# Altium PCB PCB1.PcbDoc
Units mm, origin at the board's own origin, x right, y up, seen from the top; angles counter-clockwise.
Board outline 133 x 70 mm, 2 copper layers (Top Layer, Bottom Layer); 56 components, 56 nets, 401 pads, 407 vias.
Unrouted connection lines stored in the file: 29.
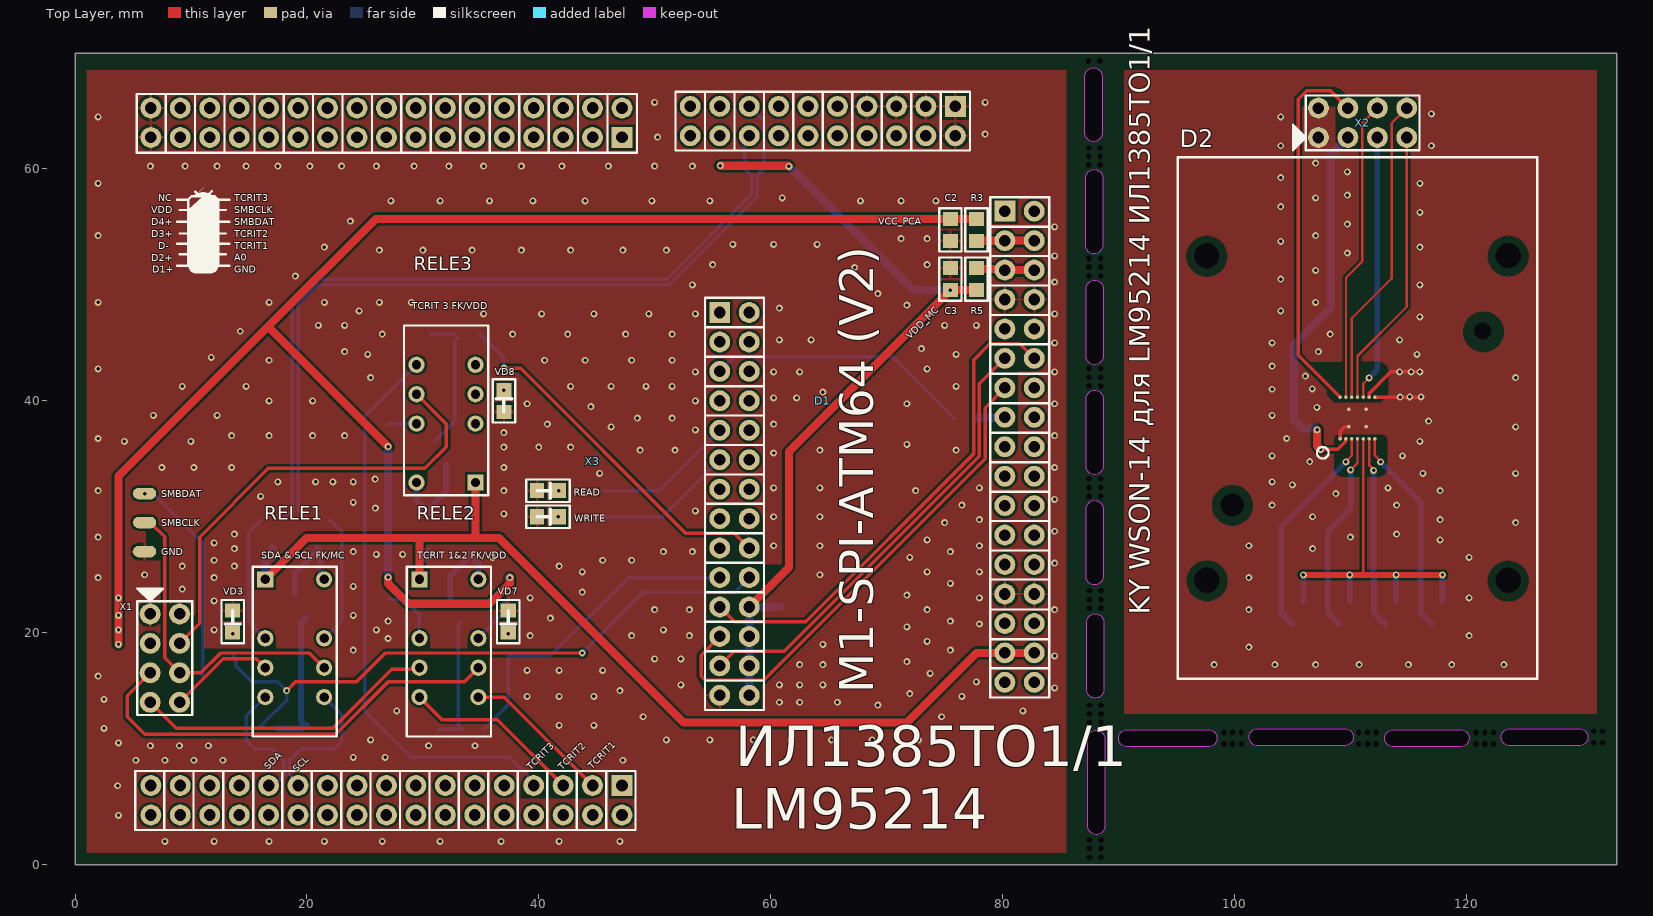
[diagram p0: Top Layer view]
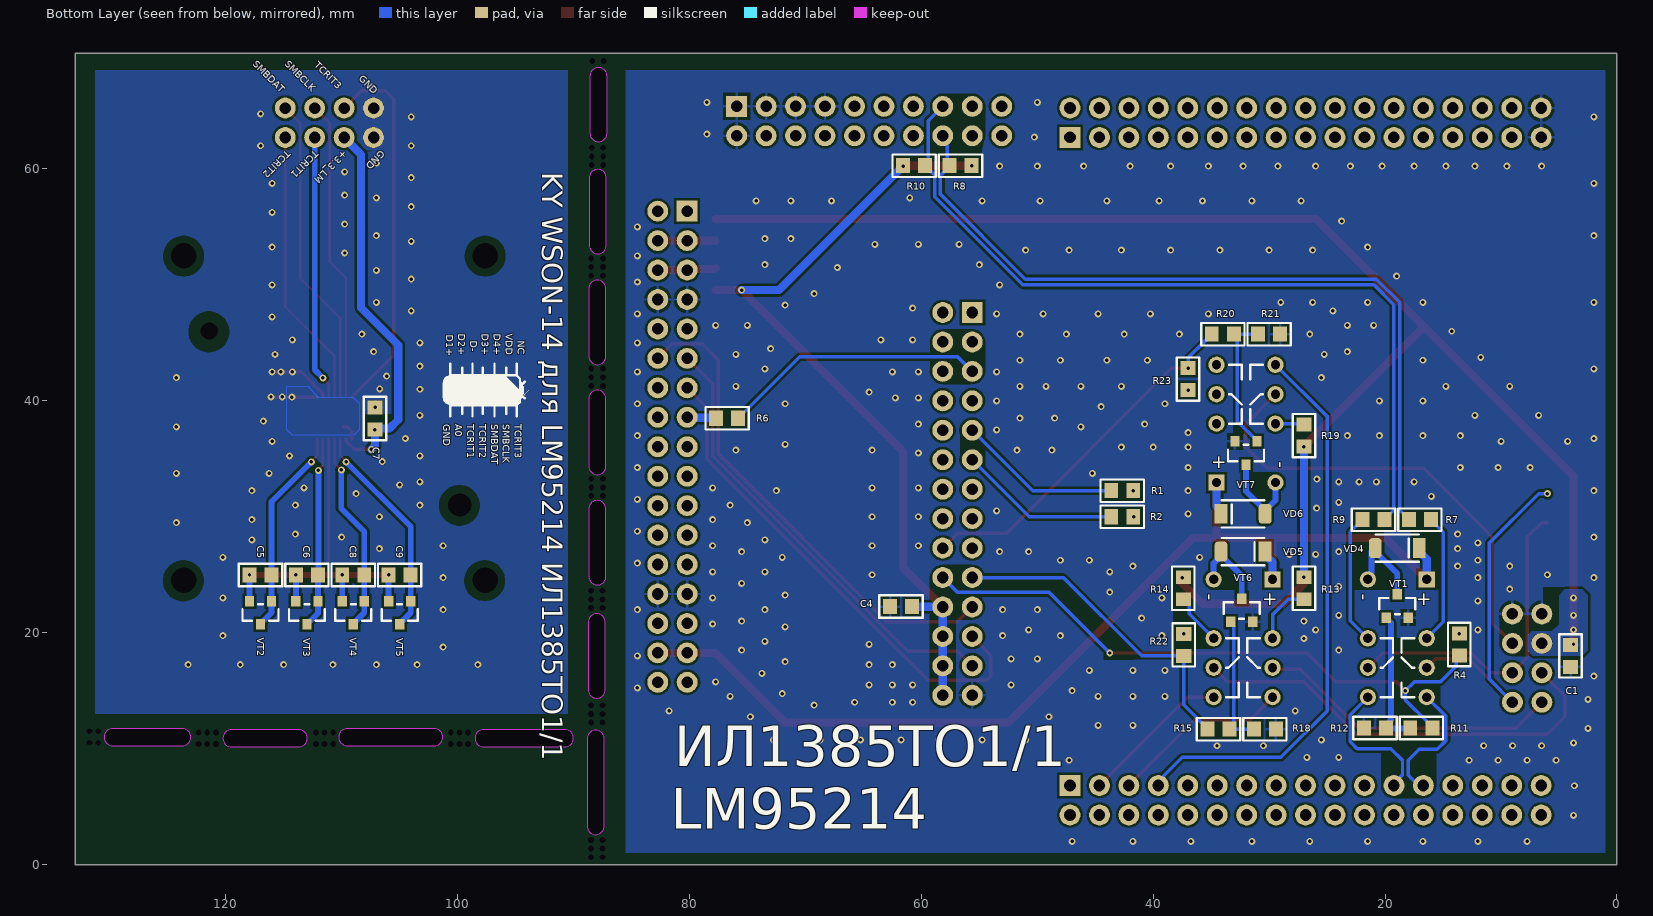
[diagram p1: Bottom Layer view, seen from below]

## Layer stack, top to bottom
Top Solder: solder mask 0.0102, Solder Resist, Dk 3.5
Top Layer: signal copper 0.0356
Dielectric 1: dielectric 0.32, FR-4, Dk 4.8
Bottom Layer: signal copper 0.0356
Bottom Solder: solder mask 0.0102, Solder Resist, Dk 3.5

## Board outline
0,0 133,0 133,70 0,70
cut-out: 109.515,11.73 cw(c109.515,10.989) 109.515,10.247 102.006,10.247 cw(c102.006,10.989) 102.006,11.73
cut-out: 97.758,11.637 cw(c97.758,10.895) 97.758,10.154 90.75,10.154 cw(c90.75,10.895) 90.75,11.637
cut-out: 129.75,11.73 cw(c129.75,10.989) 129.75,10.247 123.756,10.247 cw(c123.756,10.989) 123.756,11.73
cut-out: 119.508,11.637 cw(c119.508,10.895) 119.508,10.154 113.712,10.154 cw(c113.712,10.895) 113.712,11.637
cut-out: 88.742,15.087 cw(c88,15.087) 87.258,15.087 87.258,20.883 cw(c88,20.883) 88.742,20.883
cut-out: 88.589,63.087 cw(c87.848,63.087) 87.106,63.087 87.106,68 cw(c87.848,68) 88.589,68
cut-out: 88.647,53.423 cw(c87.905,53.423) 87.164,53.423 87.164,59.219 cw(c87.905,59.219) 88.647,59.219
cut-out: 88.685,43.87 cw(c87.943,43.87) 87.201,43.87 87.201,49.666 cw(c87.943,49.666) 88.685,49.666
cut-out: 88.685,34.37 cw(c87.943,34.37) 87.201,34.37 87.201,40.166 cw(c87.943,40.166) 88.685,40.166
cut-out: 88.835,3.33 cw(c88.093,3.33) 87.352,3.33 87.352,10.839 cw(c88.093,10.839) 88.835,10.839
cut-out: 88.685,24.87 cw(c87.943,24.87) 87.201,24.87 87.201,30.666 cw(c87.943,30.666) 88.685,30.666

## Design rules (kind name [scope] priority, off if disabled: settings)
Clearance [All] p1: gap=0.2 ignorepadtopadclearanceinfootprint=FALSE except(0: Arc-Hole Track-Hole SMDPad-Hole THPad-Hole Via-Hole Fill-Hole Poly-Hole Region-Hole Text-Hole)
ComponentClearance [All] p1: gap=0 collisioncheckmode=3 verticalgap=0 showdistances=FALSE
HoleToHoleClearance [All] p1: gap=0.1 allowstackedmicrovias=TRUE
PolygonConnect [InNet('GND')] p1: thpad.connectstyle=Relief thpad.reliefconductorwidth=0.254 thpad.reliefentries=4 thpad.polygonreliefangle="90 Angle" thpad.airgapwidth=0.254 smdpad.connectstyle=Relief smdpad.reliefconductorwidth=0.254 smdpad.reliefentries=4 smdpad.polygonreliefangle="90 Angle" smdpad.airgapwidth=0.254 via.connectstyle=Direct via.reliefconductorwidth=0.254 via.reliefentries=4 via.polygonreliefangle="90 Angle" via.airgapwidth=0.254
RoutingVias [All] p1: holewidth=0.3 width=0.6 viastyle="Through Hole" minholewidth=0.3 minwidth=0.6 maxholewidth=0.6 maxwidth=1.2
SilkToSilkClearance [All] p1: silktosilkclearance=0
SilkToSolderMaskClearance [IsPad] p1: minsilkscreentomaskgap=0 clearancetoexposedcopper=TRUE
SolderMaskExpansion [All] p1: expansion=0.102 istentingtop=FALSE
Width [All] p1: maxlimit=1.2 minlimit=0.2 preferedwidth=0.3
26 further rules are at their usual default settings.

## Components (designator, comment, footprint, x,y, rotation, side; value= is the part's Value field where it differs from the comment)
C1 "0.1uF" 0805 4,18 r270 bottom
C2 "10uF" 0805 75.5,54.75 r270 top
C3 "10uF" 0805 75.5,50.5 r90 top
C4 "0.1uF" 0805 61.75,22.25 r0 bottom
C5 "100pF" 0805 117,24.98 r180 bottom
C6 "100pF" 0805 113,24.98 r180 bottom
C7 "100pF" 0805 107.12,38.48 r90 bottom
C8 "100pF" 0805 109,24.98 r180 bottom
C9 "100pF" 0805 105,24.98 r180 bottom
D1 "M1-SPI-ATM64(V2)" M1-SPI-ATM64(V2) 64.5,40 r270 top locked
D2 "LM95214" LM95214 110.617,38.521 r180 top locked
GND "Contact" Contact 6,27 r180 top (schematic designator KP3)
R1 "2.2k" 0805 42.67,32.25 r180 bottom
R2 "2.2k" 0805 42.67,30 r180 bottom
R3 "1" 0805 77.75,54.75 r90 top
R4 "2.2k" 0805 13.6,18.98 r90 bottom
R5 "1" 0805 77.75,50.5 r270 top
R6 "1" 0805 76.75,38.5 r0 bottom
R7 "100" 0805 17,29.75 r0 bottom
R8 "4.7k" 0805 56.62,60.28 r180 bottom
R9 "100" 0805 21,29.75 r180 bottom
R10 "4.7k" 0805 60.62,60.28 r0 bottom
R11 "1k" 0805 16.88,11.78 r0 bottom
R12 "20k" 0805 20.88,11.78 r0 bottom
R13 "10k" 0805 27,23.832 r90 bottom
R14 "10k" 0805 37.405,23.832 r90 bottom
R15 "1k" 0805 34.37,11.68 r180 bottom
R18 "20k" 0805 30.37,11.68 r180 bottom
R19 "10k" 0805 27,37 r270 bottom
R20 "1k" 0805 34,45.75 r180 bottom
R21 "20k" 0805 30,45.75 r180 bottom
R22 "2.2k" 0805 37.37,18.955 r90 bottom
R23 "2.2k" 0805 37,41.87 r270 bottom
READ "LED(0805)" 0805(LED) 40.8,32.25 r180 top (schematic designator VD1)
RELE1 "V23079A1001B301 TE" V23079A1001B301 18.95,18.3 r270 top locked (schematic designator K1)
RELE2 "V23079A1001B301 TE" V23079A1001B301 32.25,18.3 r270 top locked (schematic designator K2)
RELE3 "V23079A1001B301 TE" V23079A1001B301 32,39.25 r90 top locked (schematic designator K3)
SMBCLK "Contact" Contact 6,29.5 r180 top (schematic designator KP2)
SMBDAT "Contact" Contact 6,32 r180 top (schematic designator KP1)
VD3 "LED(0805)" 0805(LED) 13.6,20.95 r90 top
VD4 "LL4148 NXP" SOD80C 18.95,27.3 r180 bottom
VD5 "LL4148 NXP" SOD80C 32.25,27 r180 bottom
VD6 "LL4148 NXP" SOD80C 32.25,30.25 r0 bottom
VD7 "LED(0805)" 0805(LED) 37.37,20.95 r90 top
VD8 "LED(0805)" 0805(LED) 37,40 r270 top
VT1 "MMBT5551L" SOT-23 18.95,22.3 r180 bottom
VT2 "MMBT3904" SOT-23 117,21.73 r0 bottom
VT3 "MMBT3904" SOT-23 113,21.73 r0 bottom
VT4 "MMBT3904" SOT-23 109,21.73 r0 bottom
VT5 "MMBT3904" SOT-23 105,21.73 r0 bottom
VT6 "MMBT5551L" SOT-23 32.37,21.93 r180 bottom
VT7 "MMBT5551L" SOT-23 32,35.5 r0 bottom
WRITE "LED(0805)" 0805(LED) 40.8,30 r180 top (schematic designator VD2)
X1 "PBD-8" PBD-8 7.75,14 r0 top locked
X2 "PBD-8" PBD-8 114.87,63.98 r90 top
X3 "FORMULA" FORMULA 35,33.5 r0 top locked

## Footprints (in the part's own frame and the unit in brackets; to place one, negate y for a bottom-side part, rotate by r counter-clockwise, add the part's x,y. Pads: shape width x height; smd on the part's side, far side on the other; paste and mask are expansions set on the pad)
0805 [mm]
  rect 1.2x1.3 smd: 1(-0.95,0) 2(0.95,0)
  silkscreen extent -1.87,-0.97 1.87,0.97, body extent -1.05,-0.63 0.95,0.63, height 0.55
0805(LED) [mm]
  rect 1.2x1.3 smd: 1(-0.95,0) 2(0.95,0)
  silkscreen extent -1.87,-0.97 1.87,0.97, body extent -1.03,-0.41 1.03,0.5, height 0.85
Contact [mm]
  oval 2x1 smd: 1(0,0)
FORMULA [mm]
  rect 1.8x1.8 hole 1: 1(12.18,29.22) VDDF(12.18,-26.68) VEEF(45.2,22.86)
  round 1.8 hole 1: 2(9.64,29.22) 3(7.1,29.22) 4(4.56,29.22) 5(2.02,29.22) 6(-0.52,29.22) 7(-3.06,29.22) 8(-5.6,29.22) 9(-8.14,29.22) 10(-10.68,29.22) 11(-13.22,29.22) 12(-15.76,29.22) 13(-18.3,29.22) 14(-20.84,29.22) 15(-23.38,29.22) 16(-25.92,29.22) 17(12.18,31.76) 18(9.64,31.76) 19(7.1,31.76) 20(4.56,31.76) 21(2.02,31.76) 22(-0.52,31.76) 23(-3.06,31.76) 24(-5.6,31.76) 25(-8.14,31.76) 26(-10.68,31.76) 27(-13.22,31.76) 28(-15.76,31.76) 29(-18.3,31.76) 30(-20.84,31.76) 31(-23.38,31.76) 32(-25.92,31.76) 33(-28.46,-29.22) 34(-25.92,-29.22) 35(-23.38,-29.22) 36(-20.84,-29.22) 37(-18.3,-29.22) 38(-15.76,-29.22) 39(-13.22,-29.22) 40(-10.68,-29.22) 41(-8.14,-29.22) 42(-5.6,-29.22) 43(-3.06,-29.22) 44(-0.52,-29.22) 45(2.02,-29.22) 46(4.56,-29.22) 47(7.1,-29.22) 48(9.64,-29.22) 49(-28.46,-26.68) 50(-25.92,-26.68) 51(-23.38,-26.68) 52(-20.84,-26.68) 53(-18.3,-26.68) 54(-15.76,-26.68) 55(-13.22,-26.68) 56(-10.68,-26.68) 57(-8.14,-26.68) 58(-5.6,-26.68) 59(-3.06,-26.68) 60(-0.52,-26.68) 61(2.02,-26.68) 62(4.56,-26.68) 63(7.1,-26.68) 64(9.64,-26.68) +5V(45.2,-15.24) +5V(47.74,-15.24) +5V_VCCF(45.2,20.32) +5V_VCCS(47.74,20.32) +5V_VDDF(45.2,17.78) +5V_VDDS(47.74,17.78) +12V(45.2,-12.7) +12V(47.74,-12.7) -12V(45.2,-17.78) -12V(47.74,-17.78) GND(-28.46,29.22) GND(-28.46,31.76) GND(45.2,-10.16) GND(45.2,15.24) GND(47.74,-10.16) GND(47.74,15.24) IN-OUT1(47.74,10.16) IN-OUT2(47.74,7.62) IN-OUT3(47.74,5.08) IN-OUT4(47.74,2.54) IN-OUT5(47.74,0) IN-OUT6(47.74,-2.54) IN-OUT7(47.74,-5.08) IN-OUT8(47.74,-7.62) NC(45.2,12.7) NC(47.74,12.7) OUT1(45.2,10.16) OUT2(45.2,7.62) OUT3(45.2,5.08) OUT4(45.2,2.54) OUT5(45.2,0) OUT6(45.2,-2.54) OUT7(45.2,-5.08) OUT8(45.2,-7.62) VDDS(12.18,-29.22) VEES(47.74,22.86)
  silkscreen extent -29.8,-30.51 49.02,32.97, body extent -29.79,-30.4 48.98,32.92, height 3
LM95214 [mm]
  round 0 hole 2.2 unplated: 0(-13,14) 0(-13,-14) 0(13,14) 0(13,-14)
  round 0 hole 1.5 unplated: 0(-10.8,-7.5)
  round 0 hole 2 unplated: 0(10.8,7.5)
  round 0.3 smd: 1(1.5,1.8) 2(1,1.8) 3(0.5,1.8) 4(0,1.8) 5(-0.5,1.8) 6(-1,1.8) 7(-1.5,1.8) 8(-1.5,-1.8) 9(-1,-1.8) 10(-0.5,-1.8) 11(0,-1.8) 12(0.5,-1.8) 13(1,-1.8) 14(1.5,-1.8) 15(-0.75,0.75) 15(-0.75,-0.75) 15(0.75,0.75) 15(0.75,-0.75)
  silkscreen extent -15.5,-22.5 15.5,22.5
M1-SPI-ATM64(V2) [mm]
  rect 1.8x1.8 hole 1: 1X2(-25.4,11.43) 1X3(-7.62,-8.89)
  round 1.8 hole 1: 2X2(-22.86,11.43) 2X3(-7.62,-6.35) 3X2(-25.4,8.89) 3X3(-5.08,-8.89) 4X2(-22.86,8.89) 4X3(-5.08,-6.35) 5X2(-25.4,6.35) 5X3(-2.54,-8.89) 6X2(-22.86,6.35) 6X3(-2.54,-6.35) 7X2(-25.4,3.81) 7X3(0,-8.89) 8X2(-22.86,3.81) 8X3(0,-6.35) 9X2(-25.4,1.27) 9X3(2.54,-8.89) 10X2(-22.86,1.27) 10X3(2.54,-6.35) 11X2(-25.4,-1.27) 11X3(5.08,-8.89) 12X2(-22.86,-1.27) 12X3(5.08,-6.35) 13X2(-25.4,-3.81) 13X3(7.62,-8.89) 14X2(-22.86,-3.81) 14X3(7.62,-6.35) 15X2(-25.4,-6.35) 15X3(10.16,-8.89) 16X2(-22.86,-6.35) 16X3(10.16,-6.35) 17X2(-25.4,-8.89) 17X3(12.7,-8.89) 18X2(-22.86,-8.89) 18X3(12.7,-6.35) 19X2(-25.4,-11.43) 19X3(15.24,-8.89) 20X2(-22.86,-11.43) 20X3(15.24,-6.35) 21X3(17.78,-8.89) 22X3(17.78,-6.35) 23X3(20.32,-8.89) 24X3(20.32,-6.35) 25X3(22.86,-8.89) 26X3(22.86,-6.35) 27X3(25.4,-8.89) 28X3(25.4,-6.35)
  silkscreen extent -26.67,-12.7 26.67,12.7
PBD-8 [mm]
  round 1.8 hole 1: 1(-1.27,7.62) 2(-1.27,5.08) 3(-1.27,2.54) 4(-1.27,0) 5(1.27,0) 6(1.27,2.54) 7(1.27,5.08) 8(1.27,7.62)
  silkscreen extent -2.37,-1.1 2.36,9.82, body extent -2.52,-1.52 2.48,9.14, height 5.5
SOD80C [mm]
  rrect50% 1.1x1.7 smd: 1(-1.9,0)
  rect 1.1x1.7 smd: 2(1.9,0)
  silkscreen extent -1.85,-1.17 1.85,1.17, body extent -1.9,-0.8 1.8,0.8, height 1.55
SOT-23 [mm]
  rect 0.8x0.9 smd: 1(-0.95,-1) 1(-0.95,-1) 2(0.95,-1) 2(0.95,-1) 3(0,1) 3(0,1)
  silkscreen extent -1.55,-0.72 1.55,0.7, body extent -1.5,-1.25 1.5,1.25, height 1.05
V23079A1001B301 [mm]
  rect 1.4x1.4 hole 0.8: 1(-6.3,-2.54)
  round 1.4 hole 0.8: 3(-1.22,-2.54) 4(1.32,-2.54) 5(3.86,-2.54) 8(3.86,2.54) 9(1.32,2.54) 10(-1.22,2.54) 12(-6.3,2.54)
  silkscreen extent -7.4,-3.63 7.25,3.63, body extent -7.25,-3.6 7.25,3.6, height 9.4

## Part data
C1 C2 C3 C4 C5 C6 C7 C8 C9: library part C0805, ComponentHeigt=1.3, Firme=AVX, KIND=Конденсатор, Leadform=SMD, Packaging=0805
R1 R2 R3 R4 R5 R6 R7 R8 R9 R10 R11 R12 R13 R14 R15 R18 R19 R20 R21 R22 R23: library part "R0805 Yageo", ComponentHeigt=0.6, Firme=Yageo, KIND=Резистор, Leadform=SMD, Packaging=0805
VT2 VT3 VT4 VT5: library part MMBT5551L, ComponentHeigt=1.1, Firme=ONS, KIND="Транзистор MMBT5551L*G ONS", Leadform=SMD, NN=24007468, Packaging=SOT-23
D1: ComponentHeigt=5.5, Name=Вилка, Specification="Вилка PLD2-2 *", Typ=PLD2-2
READ VD3 VD7 VD8 WRITE: ComponentHeigt=0.75, Firme=Kingbright, KIND="Светодиод L-1154GD Kingbright", Leadform="в отверстия", NN=24003000
VD4 VD5 VD6: Component Link=http://www.nxp.com, ComponentHeigt=1.6, Firme=NXP, KIND="Диод LL4148 NXP", Leadform=SMD, NN=24009301, Packaging=SOD-80C
VT1 VT6 VT7: ComponentHeigt=1.1, Firme=ONS, KIND="Транзистор MMBT5551L*G ONS", Leadform=SMD, NN=24007468, Packaging=SOT-23

## Free pads (board coordinates)
  round 0 hole 0.5 unplated: 38(88.433,61.086) 38(88.47,32.533) 38(88.47,42.033) 38(88.47,51.533) 38(88.5,0.625) 38(88.5,13) 38(88.5,22.875) 38(99.845,11.395) 38(112.22,11.395) 38(121.595,11.395) 39(88.433,61.836) 39(88.47,33.283) 39(88.47,42.783) 39(88.47,52.283) 39(88.5,1.375) 39(88.5,2.125) 39(88.5,13.75) 39(88.5,23.625) 39(99.095,11.395) 39(110.72,11.395) 39(111.47,11.395) 39(120.845,11.395) 39(131,11.5) 39(131.75,11.5) 41(87.392,69.305) 41(87.433,60.336) 41(87.433,61.086) 41(87.47,31.783) 41(87.47,32.533) 41(87.47,41.283) 41(87.47,42.033) 41(87.47,50.783) 41(87.47,51.533) 41(87.5,0.625) 41(87.5,12.25) 41(87.5,13) 41(87.5,22.125) 41(87.5,22.875) 41(99.845,10.395) 41(100.595,10.395) 41(112.22,10.395) 41(121.595,10.395) 41(122.345,10.395) 42(87.433,61.836) 42(87.47,33.283) 42(87.47,42.783) 42(87.47,52.283) 42(87.5,1.375) 42(87.5,2.125) 42(87.5,13.75) 42(87.5,23.625) 42(99.095,10.395) 42(110.72,10.395) 42(111.47,10.395) 42(120.845,10.395) 42(131,10.5) 42(131.75,10.5) 43(88.392,69.305) 43(88.433,60.336) 43(88.47,31.783) 43(88.47,41.283) 43(88.47,50.783) 43(88.5,12.25) 43(88.5,22.125) 43(100.595,11.395) 43(122.345,11.395)

## Via types
v1: diameter 0.6, hole 0.3, Top Layer to Bottom Layer, tented both sides, 407 vias

## Nets (pads, with @x,y where several pads share a name; then routed paths per layer and width w, separated by ;. In a path a pad name is that pad's centre, name@x,y a point inside that pad or via, vN(x,y) a via of type N, cw(c..) or ccw(c..) an arc to the next point about the centre after c; other vN are vias at no path point)
+3.3_LM: C7.1 D2.2 X2.2 | length 34.8
  Top Layer w0.3: v1(107.443,35.807) 108.91,35.807 109.617,36.514 D2.2
  Top Layer w0.7: v1(107.136,37.496) 107.136,36.114 v1(107.443,35.807)
  Bottom Layer w0.7: C7.1@107.033,37.617 105.872,37.617 105.12,38.369 105.12,44.822 108.325,48.027 108.325,61.245 X2.2 ; v1(107.136,37.496) 107.136,36.114 v1(107.443,35.807)
+3.3V_VCC: R3.1 X3.+5V_VCCF X3.+5V_VCCS | length 5
  Top Layer w0.7: R3.1 77.76,53.81 80.19,53.81 X3.+5V_VCCF X3.+5V_VCCS
  Bottom Layer w0.7: X3.+5V_VCCF@80.19,53.81 X3.+5V_VCCF
+3.3V_VDD: R5.1 X3.+5V_VDDF X3.+5V_VDDS | length 5.1
  Top Layer w0.7: R5.1 77.835,51.365 80.115,51.365 X3.+5V_VDDF X3.+5V_VDDS
+5V_CONST: RELE1.1 RELE2.1 RELE3.1 VD4.2 VD5.2 VD6.2 X3.+5V | length 93.8
  Top Layer w0.7: RELE1.1 19.98,28.17 29.71,28.17 ; RELE2.1 29.71,28.17 ; RELE3.1 34.54,28.17 ; X3.+5V@82.74,18.26 80.2,18.26 77.76,18.26 71.75,12.25 52.5,12.25 36.58,28.17 34.54,28.17 ; 29.71,28.17 34.54,28.17
  Bottom Layer w0.7: RELE1.1 16.41,26.36 17.05,27 VD4.2 ; RELE2.1 29.71,26.09 30.12,26.5 30.15,26.5 30.35,26.7 VD5.2 ; VD6.2 34.15,30.55 34.54,30.94 RELE3.1
AGND: C7.2 D2.1 D2.8 D2.9 D2.15 X2.1 X2.8 | length 11
  Top Layer w0.3: D2.1 109.117,37.367 109.521,37.771 D2.15@109.867,37.771 ; D2.9@111.636,40.321 111.636,40.636 113.5,42.5 v1(116,42.5) ; D2.8@112.139,40.317 116.067,40.317 v1(116.095,40.345)
  other v1: 98.25,17.25 103.5,17.25 107,17.25 110.75,17.25 115,17.25 118.75,17.25 123.25,17.25 101.25,18.75 120.25,19.75 101.25,22 120.25,23 101.25,24.75 120.25,26.5 106.75,27.25 101.25,27.5 117.75,28 110,28.25 114,28.5 124.25,29.5 117.75,29.75 106.75,30 103.25,31 114,31 108.75,32 117.75,32.25 113.25,32.5 105,32.75 103.25,33 116.25,33.75 124.25,33.75 106.5,34.75 103.25,35.25 114.5,35.25 116,36.5 104.5,36.75 124.25,37.75 116.75,38.25 103.25,38.75 107.12,39.43 114.289,40.32 115.126,40.336 103.25,41 106.716,41.034 124.25,42 106.123,42.123 114.25,42.5 115.25,42.5 103.25,43 115.75,44 107.25,44.25 103.25,45 114.25,45.25 108.25,45.75 116,47.25 104,47.75 107,48.5 116,50 104,50.5 107,51.25 109.75,52.75 116,53.25 104,53.75 107,54.25 109.75,55.25 116,56.25 104,56.75 107,57.5 109.75,57.75 116,58.75 104,59.25 109.75,59.75 107,60.5 104,62 117,62 104,64.5 117,64.75
D1+_LM: C5.2 D2.7 VT2.1 VT2.3 | length 18
  Top Layer w0.2: D2.7@112.12,36.68 112.12,35.291 112.62,34.791 v1(112.62,34.73)
  Bottom Layer w0.5: v1(112.62,34.73) 116.05,31.3 C5.2 116.05,22.73 116.05,21.73 117,20.78 VT2.3@117,20.73
D2+_LM: C6.2 D2.6 VT3.1 VT3.3 | length 16.6
  Top Layer w0.2: D2.6@111.62,36.68 111.62,34.461 112,34.081 v1(112,34)
  Bottom Layer w0.5: v1(112,34) 112,25.03 C6.2 112.05,22.73 112.05,21.68 112.8,20.93 112.85,20.93 113,20.78 VT3.3@113,20.73
D3+_LM: C8.2 D2.4 VT4.1 VT4.3 | length 17.4
  Top Layer w0.2: v1(110.033,34.045) 110.62,34.632 D2.4@110.62,36.721
  Bottom Layer w0.5: VT4.3@109,20.78 108.05,21.73 108.05,22.73 C8.2 108.05,28.73 110.033,30.713 v1(110.033,34.045)
D4+_LM: C9.2 D2.3 VT5.1 VT5.3 | length 18.9
  Top Layer w0.2: v1(109.62,34.73) 109.62,34.791 110.12,35.291 D2.3@110.12,36.68
  Bottom Layer w0.5: VT5.3@105,20.73 105,20.78 104.05,21.73 104.05,22.73 C9.2 104.05,29.16 v1(109.62,34.73)
D-_LM: C5.1 C6.1 C8.1 C9.1 D2.5 VT2.2 VT3.2 VT4.2 VT5.2 | length 32.8
  Top Layer w0.2: 111.12,24.989 D2.5@111.12,36.721
  Top Layer w0.5: v1(105.95,24.98) 107.129,24.98 v1(109.95,24.98) 111.129,24.98 111.12,24.989 113.94,24.989 v1(113.95,24.98) v1(117.95,24.98)
  Bottom Layer w0.5: VT5.2@105.95,22.73 v1(105.95,24.98) ; VT4.2@109.95,22.73 v1(109.95,24.98) ; VT3.2@113.95,22.73 v1(113.95,24.98) ; VT2.2@117.95,22.73 v1(117.95,24.98)
DI1_MC: D1.21X3 X3.IN-OUT1 | length 42.9
  Top Layer w0.3: D1.21X3 56.9,20.93 63.016,20.93 77.5,35.414 77.5,43.5 78.91,44.91 81.49,44.91 X3.IN-OUT1
DO1_MC: D1.25X3 X3.OUT1 | length 39.2
  Top Layer w0.3: D1.25X3 56.86,18.39 61.183,18.39 78,35.207 78,41.46 X3.OUT1
DO2_MC: D1.23X3 X3.OUT2 | length 43.5
  Top Layer w0.3: D1.23X3 54,18.07 54,16.25 54.36,15.89 59.39,15.89 78.5,35 78.5,39.42 X3.OUT2
GND: C1.2 C2.2 C3.2 C4.2 D1.1X2 D1.2X2 D1.3X2 D1.5X2 D1.7X2 D1.27X3 GND.1 R12.2 R18.2 R21.2 READ.2 VD3.2 VD7.2 VD8.2 VT1.2 VT6.2 VT7.2 WRITE.2 X1.1 X1.8 X3.GND
  other v1: 7.75,2 12,2 16.75,2 21.5,2 26.5,2 31.5,2 36.75,2 41.75,2 47,2 3.75,4.25 3.675,6.799 5.25,9 7.75,9 10.25,9 12.75,9 47.25,9 24,9.25 26.75,9.25 6.5,10.25 9,10.25 11.5,10.25 30.5,10.25 34.5,10.25 3.75,10.5 25.5,10.75 51,10.75 54.75,10.75 58.5,10.75 61.75,10.75 65.25,10.75 68.75,10.75 72.75,10.75 2.5,11.75 41.75,12 44.75,12 49,12.75 74.75,12.75 27.75,13.25 81.75,13.25 69.25,13.75 60.75,14 62.5,14 65.75,14 2.5,14.25 39,14.5 41.75,14.5 44.75,14.5 76.5,14.5 72,14.75 47,15 84.5,15.25 52.25,15.5 60.75,15.5 62.5,15.5 64.5,15.5 77.75,15.75 2,16.25 73.75,16.5 39,16.75 41.75,16.75 45.5,16.75 62.5,17.25 64.5,17.25 71.75,17.5 50,17.75 52.25,17.75 84.5,18 24,18.5 75.5,18.5 64.5,19 73.5,19.25 27,19.5 39.25,19.75 48,19.75 53,19.75 12,20.25 26,20.25 50.75,20.25 71.75,20.5 78,20.75 27,21 75.5,21 41,21.25 24,21.5 50,22 53,22 73.5,22 84.5,22 12,22.75 39.25,23 78,23 71.75,23.25 43.75,23.5 9.25,23.75 24,24 75.5,24.25 2,24.75 12,24.75 6,25 64.25,25 43.75,25.25 73.5,25.25 78,25.25 9.25,25.75 13.75,25.75 41.75,25.75 84.5,26 12,26.25 45.5,26.25 48,26.25 36,26.5 72,26.5 26,26.75 28.25,26.75 24,27 50.75,27 53.25,27 75.5,27 13.75,27.25 60.25,27.5 64.25,27.5 78,27.5 12,27.75 73.5,28 2,28.25 13.75,28.5 84.5,28.75 75,29.5 78,29.75 60.25,30 64.25,30 37,30.25 53.5,30.5 25.899,30.75 76.5,31 24,31.25 84.5,31.5 16,31.75 2,32.25 37,32.25 72.5,32.25 60.25,32.5 64.25,32.5 78,32.5 17.5,33 20.75,33 22.25,33 24,33 25.879,33.256 45.25,33.75 7.5,34.25 10.25,34.25 13.5,34.25 37,34.25 84.5,34.25 60.25,35.5 48.75,35.75 51.75,35.75 64.25,35.75 76,35.75 37,36 40,36 42.75,36 71.75,36.25 4.25,36.5 10,36.5 2,36.75 13.5,37 16.75,37 20.5,37 23.25,37 84.5,37 37,37.25 53.5,37.5 46.25,37.75 40.75,38 60.25,38 48.5,38.5 51.5,38.5 6.75,38.75 12.25,38.75 44.5,39.5 39,39.75 71.75,39.75 84.5,39.75 16.75,40 20.5,40 53.5,40 60.25,40.25 62.25,40.25 64.5,40.75 9.25,41.25 14.75,41.25 42.75,41.25 46.25,41.25 49.25,41.25 51.5,41.25 76,41.25 25.5,42 53.5,42.5 60.25,42.5 62.5,42.5 84.5,42.5 2,42.75 73.5,42.75 16.75,43.5 40.5,43.5 44,43.5 48,43.5 51.5,43.5 11.75,43.75 25.25,44 76,44 23.25,44.25 73,44.5 84.5,45 60.75,45.25 63.5,45.25 26.5,45.75 37.75,45.75 42.5,45.75 47.5,45.75 51.5,45.75 14.25,46 21,46.5 23.25,46.5 75,46.5 77.75,46.5 35.25,47.5 40.25,47.5 44.75,47.5 49.5,47.5 53.5,47.5 84.5,47.5 24.5,47.75 60.75,48 71.75,48.25 2,48.5 16.75,48.5 21.5,48.5 26.25,48.5 29,48.5 69.25,49.25 53.25,50 84.5,50.25 19,50.75 67.25,51.5 55,51.75 73.5,51.75 84.5,52.5 26.25,53 30,53 34.25,53 38.5,53 42.75,53 47.25,53 51,53 21.5,53.25 56.75,53.5 60.25,53.5 64,53.5 71.25,54 73.5,54 2,54.25 84.5,55 23.75,55.5 27.25,57.25 31.5,57.25 35.75,57.25 39.5,57.25 44,57.25 49.75,57.25 54.75,57.25 67.75,57.25 71.25,57.25 74.25,57.25 61,57.5 2,58.75 6.5,60.25 9.5,60.25 12.25,60.25 14.75,60.25 17.5,60.25 20.25,60.25 23,60.25 26,60.25 29.25,60.25 32.25,60.25 35.25,60.25 38.5,60.25 42,60.25 46,60.25 50,60.25 53.25,60.25 50.25,62.75 78.5,63 2,64.5 50,65.75 78.5,65.75
LED_READ: D1.9X3 R1.1 | length 14.1
  Bottom Layer w0.3: R1.1 50.4,32.25 D1.9X3
LED_WRITE: D1.11X3 R2.1 | length 14.1
  Bottom Layer w0.3: R2.1@43.57,30 50.69,30 D1.11X3
NetK1_3: R7.1 RELE1.3 | length 11.2
  Bottom Layer w0.3: R7.1 16.05,29.7 15,28.65 15,20.93 RELE1.3
NetK1_10: R9.1 RELE1.10 | length 11.3
  Bottom Layer w0.3: RELE1.10 23,21.03 23,28.7 R9.1
NetK1_12: RELE1.12 VD4.1 VT1.3 | length 7.8
  Bottom Layer w0.5: VT1.3@18.95,23.3 18.95,25.1 20.85,27 VD4.1 21,27.15 21.173,26.977 21.173,25.215 21.49,24.898 RELE1.12
NetK2_3: R13.1 RELE2.3 | length 5.3
  Bottom Layer w0.3: R13.1 28.363,22.882 29.71,21.536 RELE2.3
NetK2_10: R14.1 RELE2.10 | length 4.5
  Bottom Layer w0.3: RELE2.10 36.905,21.636 36.905,22.432 37.355,22.882 R14.1
NetK2_12: RELE2.12 VD5.1 VT6.3 | length 7.2
  Bottom Layer w0.5: VT6.3@32.37,22.93 32.37,24.92 VD5.1@34.15,26.7 ; VD5.1 VD5.1@34.15,26.7 ; RELE2.12 34.79,25.993 34.15,26.632 VD5.1@34.15,26.7
NetK3_10: R19.1 RELE3.10 | length 2.5
  Bottom Layer w0.3: R19.1 27.08,38.03 RELE3.10
NetK3_12: RELE3.12 VD6.1 VT7.3 | length 7.7
  Bottom Layer w0.5: RELE3.12 29.46,31.416 30.041,30.835 30.052,30.835 30.35,30.536 VD6.1@30.35,30.526 ; VD6.1 30.35,30.55 32,32.2 VT7.3@32,34.5
NetR1_2: R1.2 READ.1
  other v1: 41.72,32.25
NetR2_2: R2.2 WRITE.1
  other v1: 41.67,30
NetR4_2: R4.2 VD3.1
  other v1: 13.6,19.93
NetR11_2: R11.2 R12.1 VT1.1 | length 11.9
  Bottom Layer w0.5: R11.2@17.45,11.75 R12.1@19.55,11.75 ; VT1.1@19.9,21.3 19.9,21.25 19.502,20.852 19.502,12.473 19.58,12.395 19.58,12.18 19.71,12.05 R12.1@20,12.05
NetR15_2: R15.2 R18.1 VT6.1 | length 11.6
  Bottom Layer w0.3: R18.1 R15.2 33.065,12.035 33.065,20.625 33.32,20.88 VT6.1@33.32,20.93
NetR20_2: R20.2 R21.1 VT7.1 | length 11.9
  Bottom Layer w0.3: R21.1@30.7,45.75 R20.2@32.8,45.75 ; VT7.1@31.05,36.5 31.05,36.55 32.75,38.25 32.75,45.2 R20.2@33.05,45.5
NetR22_2: R22.2 VD7.1
  other v1: 37.37,19.905
NetR23_2: R23.2 VD8.1
  other v1: 37,40.92
RELE1: D1.20X3 R4.1 R11.1 | length 54.5
  Top Layer w0.3: v1(18.25,15) 19,15.75 24.25,15.75 26.75,18.25 v1(43.75,18.25)
  Bottom Layer w0.3: R4.1 13.845,17.785 13.845,17.155 15.25,15.75 17.5,15.75 v1(18.25,15) 18.25,14.2 16.38,12.33 16.38,12.28 15.9,11.8 R11.1@15.8,11.8 ; v1(43.75,18.25) 48.97,23.47 56.86,23.47 D1.20X3
RELE2: D1.19X3 R15.1 R22.1 | length 28.2
  Bottom Layer w0.3: R15.1 35.32,11.73 37.37,13.78 R22.1 41.005,18.005 47.76,24.76 D1.19X3
RELE3: D1.18X3 R20.1 R23.1 | length 31.4
  Top Layer w0.3: v1(37,42.82) 38.43,42.82 52.66,28.59 56.86,28.59 D1.18X3
  Bottom Layer w0.3: R20.1 34.95,45.7 35.4,45.25 35.45,45.25 37,43.7 v1(37,42.82)
RST_IN: R6.2 X3.OUT3 | length 2.5
  Bottom Layer w0.7: R6.2 77.74,38.54 80.16,38.54 X3.OUT3
RST_MC: D1.5X3 R6.1 | length 22.9
  Bottom Layer w0.3: D1.5X3 56.88,43.81 70.49,43.81 R6.1
SCL_F: RELE1.8 X3.54 | length 12.1
  Bottom Layer w0.3: X3.54 19.24,7.001 18.5,7.741 18.5,9 19.5,10 22.42,10 23,10.58 23,12.93 RELE1.8
SCL_MC: D1.15X2 R9.2 R10.1 | length 71.2
  Bottom Layer w0.3: R9.2 20.05,29.8 19.6,30.25 19.55,30.25 19.25,30.55 19.25,48.293 20.957,50 51.25,50 58.853,57.603 58.853,59.462 59.17,59.78 59.22,59.78 59.67,60.23 R10.1 59.4,60.55 59.4,64.15 D1.15X2
SDA_F: RELE1.5 X3.53 | length 11.3
  Bottom Layer w0.3: RELE1.5 14.75,12.78 14.75,10.699 15.499,9.95 17.05,9.95 18,9 18,7.714 17.106,6.82 X3.53
SDA_MC: D1.16X2 R7.2 R8.1 | length 68.2
  Bottom Layer w0.3: R7.2 17.95,29.8 18.4,30.25 18.45,30.25 18.75,30.55 18.75,48.5 20.75,50.5 51.043,50.5 58.353,57.81 58.353,59.448 57.57,60.23 57.57,60.33 57.75,60.51 57.75,62.054 58.15,62.454 D1.16X2
SMBCLK: RELE1.9 SMBCLK.1 X1.6 | length 28.5
  Top Layer w0.3: SMBCLK.1 6.5,29.5 7.73,28.27 7.73,17.83 X1.6 10.853,16.54 12.563,18.25 20.22,18.25 RELE1.9
  Bottom Layer w0.3: X1.6 X1.6@9.23,16.75
SMBCLK_LM: D2.13 X2.6 | length 26.1
  Top Layer w0.2: D2.13@109.62,40.28 109.62,50.62 111.04,52.04 111.04,63.96 X2.6
SMBDAT: RELE1.4 SMBDAT.1 X1.5 | length 30.6
  Top Layer w0.3: X1.5 12.77,17.75 15.64,17.75 RELE1.4
  Bottom Layer w0.3: v1(6,32) 6.75,32 11,27.75 11,15.98 X1.5
SMBDAT_LM: D2.12 X2.5 | length 26.9
  Top Layer w0.2: D2.12 110.12,47.12 113.58,50.58 113.58,63.96 X2.5
TCRIT1: RELE2.9 X1.3 | length 37.9
  Top Layer w0.3: X1.3 4.5,14.56 4.5,12.75 6,11.25 22.5,11.25 27,15.75 33.56,15.75 RELE2.9
TCRIT1_F: RELE2.8 X3.64 | length 13
  Top Layer w0.3: RELE2.8 37.02,14.44 X3.64
TCRIT1_LM: D2.10 X2.3 | length 22.9
  Top Layer w0.2: D2.10@111.12,40.28 111.12,41.48 v1(111.62,41.98)
  Bottom Layer w0.5: v1(111.62,41.98) 112.33,42.69 X2.3
TCRIT2: RELE2.4 X1.4 | length 26.3
  Top Layer w0.3: X1.4 8.73,11.75 22.25,11.75 27.332,16.832 29.561,16.832 RELE2.4
TCRIT2_F: RELE2.5 X3.63 | length 15.5
  Top Layer w0.3: RELE2.5 31.65,12.5 36.42,12.5 X3.63
TCRIT2_LM: D2.11 X2.4 | length 24.2
  Top Layer w0.2: D2.11@110.62,40.28 110.62,43.87 114.87,48.12 X2.4
TCRIT3: RELE3.9 X1.7 | length 40
  Top Layer w0.3: X1.7 10.75,20.81 10.75,28.25 16.676,34.176 30.176,34.176 32,36 32,38.03 RELE3.9
TCRIT3_F: RELE3.8 X3.62 | length 49.1
  Bottom Layer w0.3: RELE3.8 25,38.65 25,13.25 29,9.25 37.5,9.25 39.56,7.19 X3.62
TCRIT3_LM: D2.14 X2.7 | length 32.4
  Top Layer w0.3: D2.14 105.5,43.938 105.5,66 106.25,66.75 108.29,66.75 X2.7
VCC_MC: C3.1 C4.1 D1.22X3 D1.24X3 D1.26X3 D1.28X3 R5.2 R8.2 R10.2 | length 70.6
  Top Layer w0.7: v1(55.67,60.28) 61.52,60.28 v1(61.57,60.23) ; D1.22X3 61.57,25.64 61.57,35.62 C3.1@75.2,49.25 ; v1(75.5,49.55) R5.2
  Bottom Layer w0.7: D1.28X3 D1.26X3 D1.24X3 D1.22X3 58.165,22.235 60.785,22.235 C4.1 ; v1(61.57,60.23) R10.2 ; R10.2@61.845,59.98 72.275,49.55 v1(75.5,49.55)
VDD_CLEAR: C1.1 C2.1 R3.2 R13.2 R14.2 R19.2 X1.2 | length 136.7
  Top Layer w0.7: v1(3.75,19) v1(3.75,23) 3.75,33.5 16.65,46.4 ; v1(27,24.782) 27,24.25 28.75,22.5 35.75,22.5 37.5,24.25 v1(37.5,24.75) ; v1(27,36.05) 16.65,46.4 ; R3.2 C2.1 25.95,55.7 16.65,46.4
  Bottom Layer w0.7: v1(27,24.782) v1(27,36.05) ; R14.2 37.438,24.75 v1(37.5,24.75)
  other v1: 3.75,20.25 3.75,21.5
pads on no net: D1.1X3 D1.2X3 D1.3X3 D1.4X2 D1.4X3 D1.6X2 D1.6X3 D1.7X3 D1.8X2 D1.8X3 D1.9X2 D1.10X2 D1.10X3 D1.11X2 D1.12X2 D1.12X3 D1.13X2 D1.13X3 D1.14X2 D1.14X3 D1.15X3 D1.16X3 D1.17X2 D1.17X3 D1.18X2 D1.19X2 D1.20X2 D2.0 RELE3.3 RELE3.4 RELE3.5 X3.1 X3.2 X3.3 X3.4 X3.5 X3.6 X3.7 X3.8 X3.9 X3.10 X3.11 X3.12 X3.13 X3.14 X3.15 X3.16 X3.17 X3.18 X3.19 X3.20 X3.21 X3.22 X3.23 X3.24 X3.25 X3.26 X3.27 X3.28 X3.29 X3.30 X3.31 X3.32 X3.33 X3.34 X3.35 X3.36 X3.37 X3.38 X3.39 X3.40 X3.41 X3.42 X3.43 X3.44 X3.45 X3.46 X3.47 X3.48 X3.49 X3.50 X3.51 X3.52 X3.55 X3.56 X3.57 X3.58 X3.59 X3.60 X3.61 X3.+12V X3.-12V X3.IN-OUT2 X3.IN-OUT3 X3.IN-OUT4 X3.IN-OUT5 X3.IN-OUT6 X3.IN-OUT7 X3.IN-OUT8 X3.NC X3.OUT4 X3.OUT5 X3.OUT6 X3.OUT7 X3.OUT8 X3.VDDF X3.VDDS X3.VEEF X3.VEES

## Polygon pours and split planes (outlines as drawn)
VDD_CLEAR on Bottom Layer "NONET_L-01_P-001" (solid, remove dead copper, pour order 0): 7.271,18.021 2.979,18.021 2.5,18.5 2.5,23.25 3,23.75 4.5,23.75 5,23.25 5,20.75 5.606,20.144 7.356,20.144 7.704,19.796 7.704,18.454
AGND on Bottom Layer "NONET_L-01_P-001" (solid, remove dead copper, pour order 5): 90.5,68.5 90.5,13 131.25,13 131.25,68.5
GND on Bottom Layer "NONET_L-01_P-001" (solid, remove dead copper, pour order 4): 1,68.5 1,1 85.5,1 85.5,68.5
no net on Bottom Layer "NONET_L-01_P-001" (solid, remove dead copper, pour order 1): 108.47,39.77 108.47,37.52 108.97,37.02 114.22,37.02 114.72,37.52 114.72,41.24 112.919,41.24 112.04,40.32 109.02,40.32
AGND on Top Layer "NONET_L-01_P-001" (solid, remove dead copper, pour order 3): 90.5,68.5 90.5,13 131.25,13 131.25,68.5
GND on Top Layer "NONET_L-01_P-001" (solid, remove dead copper, pour order 2): 1,68.5 1,1 85.5,1 85.5,68.5

## Other copper
Top Layer:
  pour cut-out: 108.62,36.67 108.62,34.13 ccw(c109.28,34.13) 109.28,33.47 112.47,33.47 ccw(c112.47,34.187) 113.187,34.187 113.187,36.563 ccw(c112.671,36.563) 112.671,37.079 109.029,37.079 ccw(c109.029,36.67)
  pour cut-out: 108.29,67.107 cw(c108.29,65.607) 109.79,65.607 109.79,65.25
  pour cut-out: 108.024,40.476 108.024,42.524 cw(c108.88,42.524) 108.88,43.38 112.37,43.38 cw(c112.37,42.464) 113.286,42.464 113.286,40.567 112.607,39.888 108.612,39.888
  pour cut-out: 119.736,45.953 cw(c121.486,45.953) 121.486,47.703 cw(c121.486,45.953) 123.236,45.953 cw(c121.486,45.953) 121.486,44.203 cw(c121.486,45.953) 119.736,45.953
  pour cut-out: 98.071,30.976 cw(c99.821,30.976) 99.821,32.726 cw(c99.821,30.976) 101.571,30.976 cw(c99.821,30.976) 99.821,29.226 cw(c99.821,30.976) 98.071,30.976
  pour cut-out: 95.893,24.478 cw(c97.643,24.478) 97.643,26.228 cw(c97.643,24.478) 99.393,24.478 cw(c97.643,24.478) 97.643,22.728 cw(c97.643,24.478) 95.893,24.478
  pour cut-out: 121.875,24.456 cw(c123.625,24.456) 123.625,26.206 cw(c123.625,24.456) 125.375,24.456 cw(c123.625,24.456) 123.625,22.706 cw(c123.625,24.456) 121.875,24.456
  pour cut-out: 121.869,52.481 cw(c123.619,52.481) 123.619,54.231 cw(c123.619,52.481) 125.369,52.481 cw(c123.619,52.481) 123.619,50.731 cw(c123.619,52.481) 121.869,52.481
  pour cut-out: 95.869,52.469 cw(c97.619,52.469) 97.619,54.219 cw(c97.619,52.469) 99.369,52.469 cw(c97.619,52.469) 97.619,50.719 cw(c97.619,52.469) 95.869,52.469
  pour cut-out: 59.223,22.5 59.223,21 58.5,21
  pour cut-out: 53.748,15.998 54.463,15.998 54.463,14.727
  pour cut-out: 59.25,14.455 59.25,17.14 58.15,17.14
  pour cut-out: 59.259,29.84 59.259,24.76 58.15,24.76
  pour cut-out: 54.501,28.233 54.501,22.22 55.61,22.22
  pour cut-out: 108.796,43.38 106.25,43.38 106.25,43
  pour cut-out: 37.211,22.771 37.211,23.185 36.435,23.185
  pour cut-out: 36.449,22.044 35.88,22.044 35.88,22.63
  pour cut-out: 30.367,32.95 30.367,34.25 29.75,34.25
  pour cut-out: 28.552,32.95 28.552,34.25 29,34.25
  pour cut-out: 6.127,26.239 7.75,26.239 7.75,27.25
  pour cut-out: 6.127,27.761 6.127,28.885 7.115,28.885
  pour cut-out: 12.563,18.607 9.02,18.607 9.02,16.54
  pour cut-out: 11.107,20.81 11.107,16.54 9.02,16.54
  pour cut-out: 9.769,21.49 10.75,21.49 10.75,21
  pour cut-out: 22.398,16.98 22.398,15.75 21.625,15.75
  pour cut-out: 17.318,19.52 17.318,18.25 17,18.25
  pour cut-out: 15.502,19.52 15.502,18.25 16,18.25
  pour cut-out: 39.005,7.781 40,7.781 40,8.75
  pour cut-out: 42.1,5.711 38.451,5.711 38.451,6.82
  pour cut-out: 35.697,16.98 35.697,18.25 34.75,18.25
  pour cut-out: 35.697,16.98 35.697,14.44 34.79,14.44
  pour cut-out: 42.1,5.711 44.64,5.711 44.64,6.82
  pour cut-out: 30.617,14.44 30.617,15.75 29.5,15.75
  pour cut-out: 28.802,14.44 28.802,15.75 29.5,15.75
  pour cut-out: 35.697,19.52 35.697,18.25 34.75,18.25
  pour cut-out: 33.882,19.52 33.882,18.25 34.75,18.25
  pour cut-out: 30.617,19.52 30.617,18.25 29.276,18.25
  pour cut-out: 28.802,19.52 28.802,18.25 29.75,18.25
  pour cut-out: 58.15,25.869 61.57,25.869 61.57,25.64
  pour cut-out: 57.041,24.76 57.041,22.228 58.158,22.228
  pour cut-out: 55.61,26.191 58.15,26.191 58.15,27.3
  pour cut-out: 59.259,29.84 59.259,27.3 58.15,27.3
  pour cut-out: 55.61,30.949 58.15,30.949 58.15,29.84
  pour cut-out: 54.501,29.84 54.501,27.3 55.61,27.3
  pour cut-out: 110.118,61.922 111,61.922 111,61.25
  pour cut-out: 76.9,54.9 76.9,54.6 78.6,54.6 78.6,54.9
  pour cut-out: 115.979,65.25 115.979,62.71 114.87,62.71
  pour cut-out: 112.33,66.359 114.87,66.359 114.87,65.25
  pour cut-out: 109.79,66.359 112.33,66.359 112.33,65.25
  pour cut-out: 108.681,65.25 108.681,62.71 109.79,62.71
  pour cut-out: 108.44,65.419 109.04,65.419 109.04,66
  pour cut-out: 108.397,65.377 105.5,65.377 105.5,66
  pour cut-out: 80.345,34.94 78,34.94 78,37
  pour cut-out: 81.3,38.435 81.3,36.04 80.2,36.04
  pour cut-out: 80.345,37.48 78,37.48 78,38.54
  pour cut-out: 81.3,41.265 81.3,38.58 80.2,38.58
  pour cut-out: 81.3,41.265 81.3,43.66 80.2,43.66
  pour cut-out: 80.345,42.56 82.74,42.56 82.74,43.66
  pour cut-out: 83.84,46.055 83.84,43.66 82.74,43.66
  pour cut-out: 80.055,47.3 82.74,47.3 82.74,46.2
  pour cut-out: 79.1,46.345 79.1,45 79.5,45
  pour cut-out: 76.9,50.65 76.9,50.35 78.6,50.35 78.6,50.65
  pour cut-out: 55.762,13.446 59.25,13.446 59.25,14.455
  pour cut-out: 55.465,23.32 58.158,23.32 58.158,22.228
  pour cut-out: 54.51,22.075 54.51,15.87 55.61,15.87
  pour cut-out: 15.51,14.558 15.51,16.98 16.41,16.98
  pour cut-out: 17.31,17.098 17.31,14.44 16.41,14.44
  pour cut-out: 6.48,12.9 4.5,12.9 4.5,14
  pour cut-out: 9.165,12.9 6.48,12.9 6.48,14
  pour cut-out: 5.534,18.519 5.534,16.54 6.48,16.54
  pour cut-out: 7.58,16.685 7.58,14 6.48,14
  pour cut-out: 7.92,19.225 7.92,14 8.948,14
Bottom Layer:
  pour cut-out: 119.71,45.957 cw(c121.46,45.957) 121.46,47.707 cw(c121.46,45.957) 123.21,45.957 cw(c121.46,45.957) 121.46,44.207 cw(c121.46,45.957) 119.71,45.957
  pour cut-out: 98.09,30.976 cw(c99.84,30.976) 99.84,32.726 cw(c99.84,30.976) 101.59,30.976 cw(c99.84,30.976) 99.84,29.226 cw(c99.84,30.976) 98.09,30.976
  pour cut-out: 95.919,24.486 cw(c97.669,24.486) 97.669,26.236 cw(c97.669,24.486) 99.419,24.486 cw(c97.669,24.486) 97.669,22.736 cw(c97.669,24.486) 95.919,24.486
  pour cut-out: 121.901,24.479 cw(c123.651,24.479) 123.651,26.229 cw(c123.651,24.479) 125.401,24.479 cw(c123.651,24.479) 123.651,22.729 cw(c123.651,24.479) 121.901,24.479
  pour cut-out: 121.885,52.48 cw(c123.635,52.48) 123.635,54.23 cw(c123.635,52.48) 125.385,52.48 cw(c123.635,52.48) 123.635,50.73 cw(c123.635,52.48) 121.885,52.48
  pour cut-out: 95.882,52.489 cw(c97.632,52.489) 97.632,54.239 cw(c97.632,52.489) 99.382,52.489 cw(c97.632,52.489) 97.632,50.739 cw(c97.632,52.489) 95.882,52.489
  pour cut-out: 9.02,17.971 7.704,17.971 7.704,19.125
  pour cut-out: 7.376,21.398 10.092,21.398 10.092,19.055
  pour cut-out: 6.353,22.767 6.353,23.938 4.578,23.938
  pour cut-out: 29.46,33.858 32,33.858 32,32.5
  pour cut-out: 57.041,19.68 57.041,14.6 58.15,14.6
  pour cut-out: 57.041,19.68 57.041,22.22 58.15,22.22
  pour cut-out: 59.259,19.68 59.259,14.6 58.15,14.6
  pour cut-out: 59.259,19.68 59.259,22.228 58.158,22.228
  pour cut-out: 110,33.25 110,34 109,34
  pour cut-out: 105.681,38.862 105.681,38.25 108.009,38.25 108.009,38.85
  pour cut-out: 33.85,46.6 33.85,44.9 34.15,44.9 34.15,46.6
  pour cut-out: 31.75,46.6 31.75,44.9 32.25,44.9 32.25,46.6
  pour cut-out: 16.7,5.711 19.24,5.711 19.24,6.82
  pour cut-out: 20.349,6.82 20.349,10.25 17.75,10.25
  pour cut-out: 15.591,6.82 15.591,10.25 17.75,10.25
  pour cut-out: 12.75,20.73 15.358,20.73 17.318,19.52 19.52,19.52 17.318,16.755
  pour cut-out: 14.47,19.201 14.47,18.901 12.75,18.901 12.75,19.201
  pour cut-out: 15.25,15.75 15.25,13.5 16,13.5
  pour cut-out: 16.175,17.857 13.891,17.857 13.891,17.109
  pour cut-out: 21.406,11.653 20.25,11.653 20.25,10.612
  pour cut-out: 16.41,17.888 19.766,17.888 19.766,16.673
  pour cut-out: 20.73,11.018 20.73,10 18.836,10
  pour cut-out: 19.307,12.63 19.307,9.95 17.05,9.95
  pour cut-out: 17.8,28.35 17.8,28.9 16.85,28.9
  pour cut-out: 20.131,27.596 20.131,29.25 22.962,29.25
  pour cut-out: 21.49,23.692 18.95,23.692 18.95,25.1
  pour cut-out: 21.49,23.692 23,23.692 23,28.17
  pour cut-out: 15,23.75 16.5,23.75 16.5,29
  pour cut-out: 16.85,30.6 16.85,28.9 21.15,28.9 21.15,30.6
  pour cut-out: 34.79,18.612 37.37,18.612 37.37,19.905
  pour cut-out: 36.52,19.105 36.52,18.805 38.22,18.805 38.22,19.105
  pour cut-out: 38.255,22.243 38.255,19.905 37.304,19.905
  pour cut-out: 36.555,23.982 36.555,23.682 38.255,23.682 38.255,23.982
  pour cut-out: 34.22,12.53 34.22,10.83 34.52,10.83 34.52,12.53
  pour cut-out: 26.15,23.982 26.15,23.682 27.85,23.682 27.85,23.982
  pour cut-out: 26.15,37.15 26.15,36.85 27.85,36.85 27.85,37.15
  pour cut-out: 33.107,38.25 33.107,37.204 32.823,37.204
  pour cut-out: 34.79,23.692 32.37,23.692 32.37,24.92
  pour cut-out: 41.005,17.648 44.259,17.648 44.259,18.254
  pour cut-out: 59.259,24.76 59.259,22.228 58.158,22.228
  pour cut-out: 55.61,21.111 58.165,21.111 58.165,22.235
  pour cut-out: 55.61,25.869 58.15,25.869 58.15,24.76
  pour cut-out: 54.501,34.92 54.501,33.75 55,33.75
  pour cut-out: 54.501,34.92 54.501,37.46 55.61,37.46
  pour cut-out: 110.091,34.925 110.091,34.24 110.504,34.24
  pour cut-out: 42.52,33.1 42.52,31.4 42.82,31.4 42.82,33.1
  pour cut-out: 42.454,30.859 42.454,29.159 42.754,29.159 42.754,30.859
  pour cut-out: 107.377,61.563 108.42,61.563 108.42,61.34
  pour cut-out: 111.64,34.36 112.26,34.48 112.26,35.09
  pour cut-out: 112.85,25.83 113.15,25.83 113.15,24.13 112.85,24.13
  pour cut-out: 59.25,62.86 59.25,61.13 59.607,61.13
  pour cut-out: 54.87,61.13 54.87,62.86 54.51,62.86
  pour cut-out: 54.51,65.545 54.51,62.86 55.61,62.86
  pour cut-out: 55.465,46.18 58.15,46.18 58.15,45.08
  pour cut-out: 54.51,45.225 54.51,42.54 55.61,42.54
  pour cut-out: 59.25,45.225 59.25,42.54 58.15,42.54
  pour cut-out: 55.755,41.44 58.15,41.44 58.15,42.54
  pour cut-out: 60.47,61.13 60.47,59.43 60.77,59.43 60.77,61.13
  pour cut-out: 56.47,61.13 56.47,59.43 56.949,59.43 56.949,61.13
  pour cut-out: 55.755,61.76 55.755,60.5 57.5,60.5
  pour cut-out: 55.61,65.4 55.61,62.86 56.88,62.86
  pour cut-out: 55.465,66.5 58.15,66.5 58.15,65.4
  pour cut-out: 59.25,65.545 59.25,62.86 58.15,62.86
  pour cut-out: 56.635,37.885 56.635,34.92 55.61,34.92
  pour cut-out: 76.6,39.35 76.6,37.65 76.9,37.65 76.9,39.35
  pour cut-out: 116.85,25.83 117.15,25.83 117.15,24.13 116.85,24.13
  pour cut-out: 108.85,25.95 109.15,25.95 109.15,24.25 108.85,24.25
  pour cut-out: 104.85,25.83 105.15,25.83 105.15,24.13 104.85,24.13
  pour cut-out: 112.25,33.448 112.25,34.25 113.25,34.25

## Silkscreen, mask and mechanical layers (free items; w line width, h text height)
Top Overlay:
  region: 9.773,56.466 11.05,57.65 12.05,57.65 12.345,57.355 12.345,51.64 cw(c11.705,51.64) 11.705,51 10.433,51 cw(c10.433,51.628) 9.805,51.624
  region: 10.3,57.65 cw(c10.904,57.046) 10.904,57.9 11.196,57.9 cw(c11.196,57.046) 11.8,57.65
  region: 10.3,57.65 11.05,58.4
  lines w0.2: 8.789,51.64 9.789,51.64 ; 8.789,53.545 9.789,53.545 ; 8.789,55.45 9.789,55.45 ; 8.789,57.355 9.789,57.355 ; 9.025,52.656 9.789,52.656 ; 9.041,54.434 9.789,54.434 ; 9.041,56.466 9.789,56.466 ; 9.773,51.64 9.773,54.434 9.773,57.355 10.05,57.65 12.05,57.65 12.345,57.355 12.345,54.434 ; 10.3,57.65 cw(c11.05,56.65) 11.8,57.65 ; 10.37,58.043 10.567,57.847 ; 11.585,57.858 11.799,58.072 ; 12.329,51.64 13.329,51.64 ; 12.329,52.656 13.025,52.656 ; 12.329,53.545 13.329,53.545 ; 12.329,55.45 13.329,55.45 ; 12.329,56.466 13.009,56.466 ; 12.329,57.355 13.329,57.355 ; 12.345,51.64 12.345,54.434 ; 13.009,54.434 12.345,54.434
  text "NC" at 7.173,57.204 h0.6
  text "TCRIT3" at 13.714,57.209 h0.6
  text "SMBCLK" at 13.714,56.18 h0.6
  text "VDD" at 6.573,56.175 h0.6
  text "VCC_PCA" at 69.301,55.2 h0.6
  text "D4+" at 6.573,55.145 h0.6
  text "SMBDAT" at 13.714,55.15 h0.6
  text "TCRIT2" at 13.714,54.121 h0.6
  text "D3+" at 6.573,54.116 h0.6
  text "D-" at 7.173,53.086 h0.6
  text "TCRIT1" at 13.714,53.091 h0.6
  text "D2+" at 6.573,52.057 h0.6
  text "A0" at 13.714,52.062 h0.6
  text "D1+" at 6.673,51.027 h0.6
  text "GND" at 13.714,51.032 h0.6
  text "TCRIT 3 FK/VDD" at 29.054,47.9 h0.6
  text "VDD_MC" at 72.046,45.268 h0.6 r45
  text "SDA & SCL FK/MC" at 16.054,26.4 h0.6
  text "TCRIT 1&2 FK/VDD" at 29.527,26.4 h0.6
  text "KY WSON-14 для LM95214 ИЛ1385ТО1/1" at 93.298,21.531 h3 r90
  text "M1-SPI-ATM64 (V2)" at 69.828,14.795 h5 r90
  text "TCRIT1" at 44.616,8.159 h0.6 r45
  text "SDA" at 16.647,8.137 h0.6 r45
  text "TCRIT3" at 39.296,8.089 h0.6 r45
  text "TCRIT2" at 42.046,8.089 h0.6 r45
  text "SCL" at 19.147,7.94 h0.6 r45
  text "ИЛ1385ТО1/1" at 56.94,7.299 h6
  text "LM95214" at 56.62,1.918 h6
Bottom Overlay:
  region: 94.616,40.158 cw(c95.219,40.761) 94.366,40.761 94.366,41.054 cw(c95.219,41.054) 94.616,41.658
  region: 94.897,39.625 94.616,39.928 94.616,40.866 95.953,42.203 100.626,42.203 cw(c100.626,41.563) 101.266,41.563 101.266,40.291 cw(c100.637,40.291) 100.642,39.662
  region: 94.616,40.158 93.866,40.908
  lines w0.2: 94.194,41.656 94.408,41.443 ; 94.223,40.228 94.419,40.424 ; 94.616,40.158 cw(c95.616,40.908) 94.616,41.658 ; 94.911,38.647 94.911,39.647 ; 94.911,42.187 94.911,43.187 ; 95.8,38.899 95.8,39.647 ; 95.8,42.187 95.8,42.867 ; 96.816,38.647 96.816,39.647 ; 96.816,42.187 96.816,43.187 ; 97.832,38.899 97.832,39.647 ; 97.832,42.867 97.832,42.203 ; 98.721,38.647 98.721,39.647 ; 98.721,42.187 98.721,43.187 ; 99.61,38.883 99.61,39.647 ; 99.61,42.187 99.61,42.883 ; 100.626,38.647 100.626,39.647 ; 100.626,39.631 97.832,39.631 94.911,39.631 94.616,39.908 94.616,41.908 94.911,42.203 97.832,42.203 ; 100.626,42.187 100.626,43.187 ; 100.626,42.203 97.832,42.203
  text "SMBCLK" at 114.947,68.99 h0.6 r45
  text "SMBDAT" at 117.697,68.99 h0.6 r45
  text "TCRIT3" at 112.411,68.919 h0.6 r45
  text "GND" at 108.56,67.717 h0.6 r45
  text "GND" at 106.647,61.661 h0.6 r135
  text "+3.3_LM" at 109.869,61.661 h0.6 r135
  text "TCRIT1" at 112.366,61.661 h0.6 r135
  text "TCRIT2" at 114.796,61.661 h0.6 r135
  text "KY WSON-14 для LM95214 ИЛ1385ТО1/1" at 93.298,59.719 h3 r90
  text "VDD" at 95.841,45.78 h0.6 r90
  text "D4+" at 96.87,45.78 h0.6 r90
  text "D3+" at 97.9,45.78 h0.6 r90
  text "D2+" at 99.959,45.78 h0.6 r90
  text "D1+" at 100.988,45.68 h0.6 r90
  text "NC" at 94.812,45.18 h0.6 r90
  text "D-" at 98.929,45.18 h0.6 r90
  text "TCRIT3" at 95.057,37.971 h0.6 r90
  text "SMBCLK" at 96.086,37.971 h0.6 r90
  text "SMBDAT" at 97.116,37.971 h0.6 r90
  text "TCRIT2" at 98.145,37.971 h0.6 r90
  text "TCRIT1" at 99.175,37.971 h0.6 r90
  text "A0" at 100.204,37.971 h0.6 r90
  text "GND" at 101.234,37.971 h0.6 r90
  text "ИЛ1385ТО1/1" at 81.296,7.303 h6
  text "LM95214" at 81.615,1.921 h6
Board:
  the board outline again, w0.2

## Dimensions
133,0 to 133,70 on Mechanical 1
0,0 to 133,0 on Mechanical 1

## Text inside footprints (layer, text, board x,y; h text height)
RELE1: Bottom Overlay "+" at 15.75,23.52 h2 r270; Bottom Overlay "-" at 21.06,23.37 h2 r270
RELE2: Bottom Overlay "+" at 29.05,23.52 h2 r270; Bottom Overlay "-" at 34.36,23.37 h2 r270
RELE3: Bottom Overlay "+" at 35.2,34.03 h2 r90; Bottom Overlay "-" at 29.89,34.18 h2 r90